# Altium PCB MainBoardPCB_4.PcbDoc (part 4 of 32)
Units mm, origin at the board's own origin, x right, y up, seen from the top; angles counter-clockwise.
Board outline 333.63 x 349.38 mm, 16 copper layers (L1, L2 (GND), L3 (Sign), L4 (GND), L5 (Sign), L6 (PWR/GND), L7(PWR/GND), L8 (Plane_GND), L9 (PWR/GND), L10 (PWR/GND), L11 (PWR/GND), L12 (Sign), L13 (GND), L14 (Sign), L15 (GND), L16), stack 2.502 mm thick; 2205 components, 1648 nets, 8314 pads, 3172 vias.
Unrouted connection lines stored in the file: 5141.
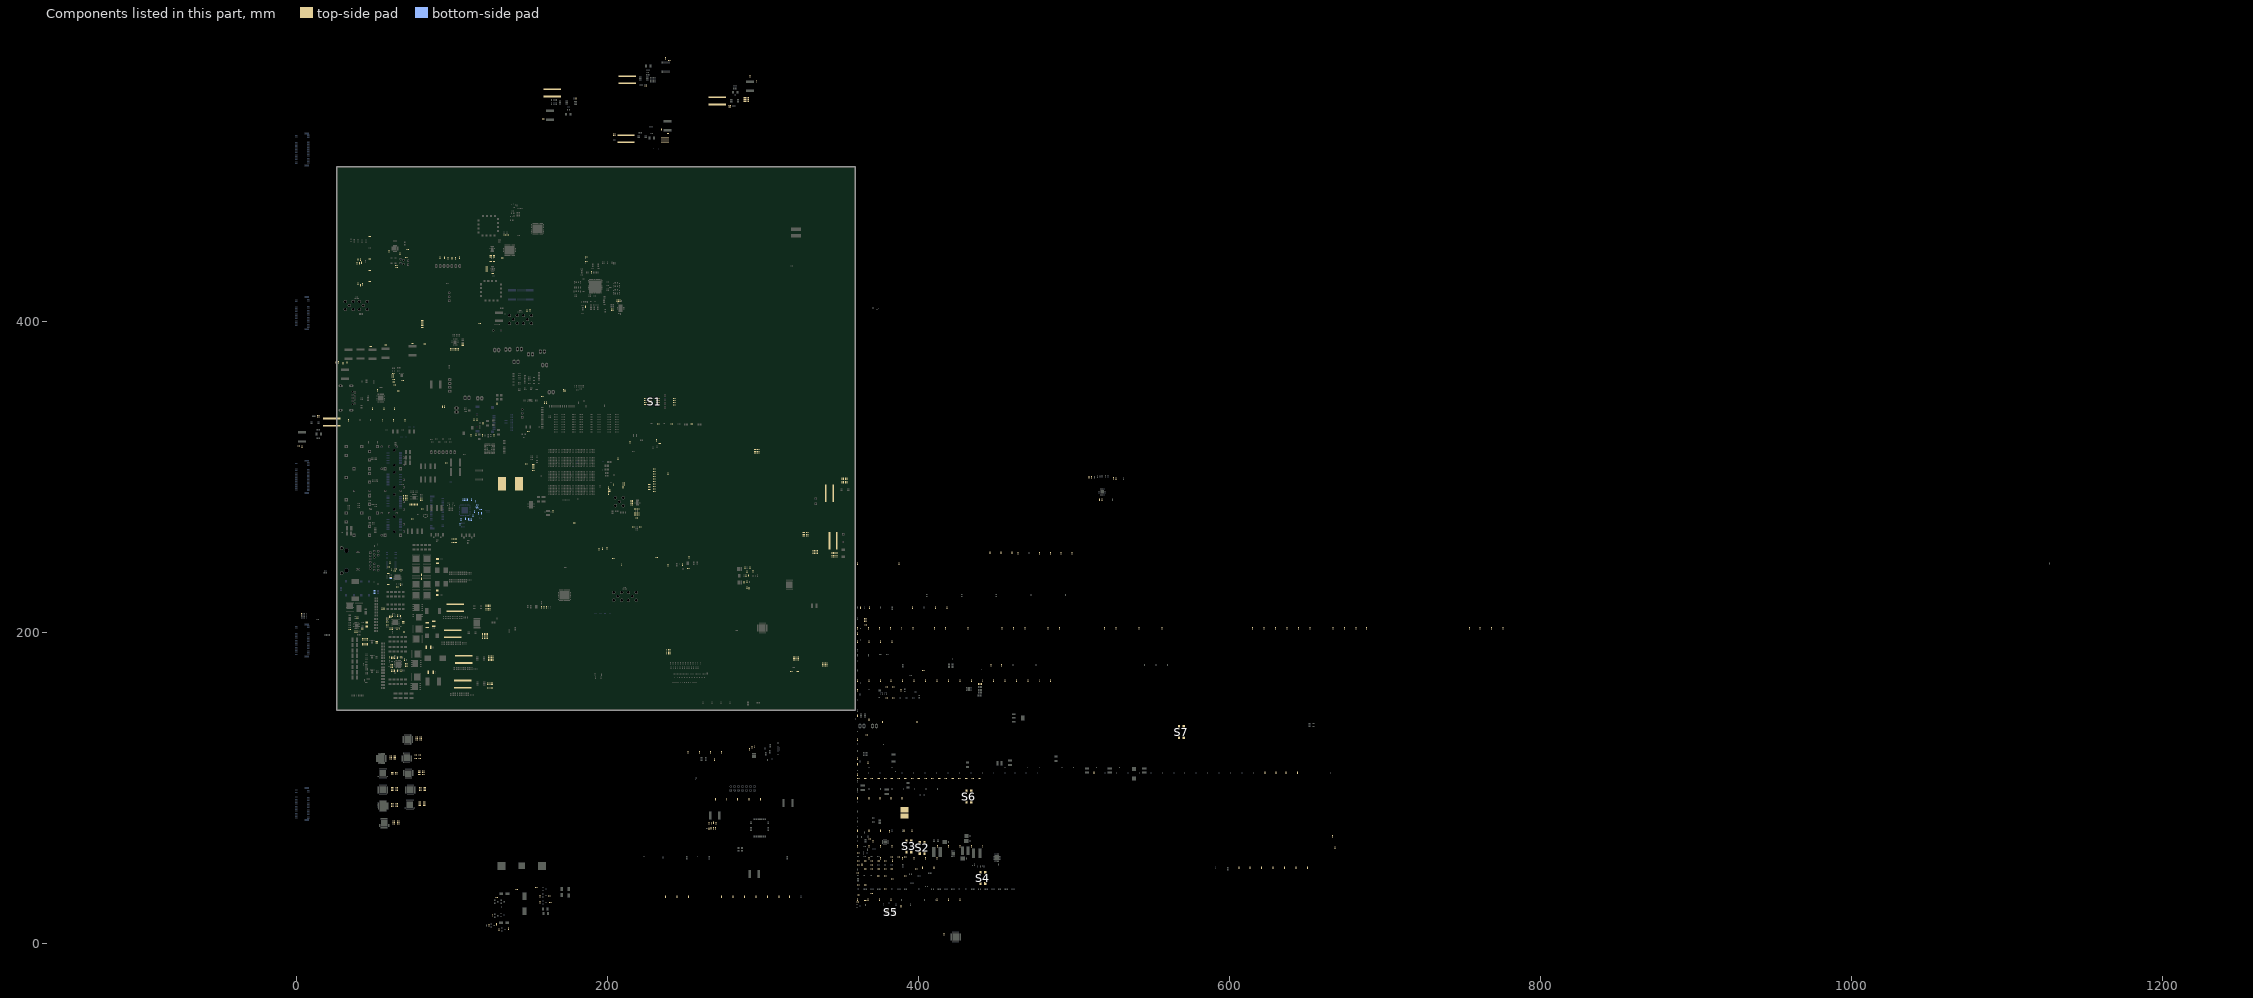
[diagram p16: the components of this part, seen from the top]

## Components (designator, comment, footprint, x,y, rotation, side; value= is the part's Value field where it differs from the comment) (continued)
R199 "0mR" "RES 0402/1005 RF" 3.202,211.734 r90 top
R200 "1.02kR" "RES 0402/1005 RF" 14.092,339.522 r0 top
R201 "0mR" "RES 0402/1005 RF" 288.214,541.35 r180 top
R202 "0mR" "RES 0402/1005 RF" 288.214,542.239 r180 top
R203 "0mR" "RES 0402/1005 RF" 288.214,543.128 r180 top
R204 "0mR" "RES 0402/1005 RF" 288.214,544.017 r180 top
R205 "0mR" "RES 0402/1005 RF" 290.373,541.35 r0 top
R206 "0mR" "RES 0402/1005 RF" 290.373,542.239 r0 top
R207 "0mR" "RES 0402/1005 RF" 290.373,543.128 r0 top
R208 "0mR" "RES 0402/1005 RF" 290.373,544.017 r0 top
R209 "1.02kR" "RES 0402/1005 RF" 278.586,537.724 r180 top
R210 "0mR" "RES 0402/1005 RF" 235.255,515.493 r270 top
R211 "0mR" "RES 0402/1005 RF" 236.525,515.493 r270 top
R212 "12.5k" "RES 0402/1005 RF" 179.728,543.303 r90 top
R213 "0mR" "RES 0402/1005 RF" 237.795,515.493 r270 top
R214 "10kR" "RES 0402/1005 RF" 224.745,551.227 r0 top
R215 "0mR" "RES 0402/1005 RF" 239.065,515.493 r270 top
R216 "31.2kR" "RES 0402/1005 RF" 14.092,338.379 r0 top
R217 "0mR" "RES 0402/1005 RF" 235.255,517.71 r90 top
R218 "10kR" "RES 0402/1005 RF" 278.793,538.867 r180 top
R219 "0mR" "RES 0402/1005 RF" 236.525,517.71 r90 top
R220 "4.99kR" "RES 0402/1005 RF" 205.029,520.065 r90 top
R221 "0mR" "RES 0402/1005 RF" 237.795,517.71 r90 top
R222 "0mR" "RES 0402/1005 RF" 239.065,517.71 r90 top
R223_I2C_Bridge "1kR" "RES 0402/1005 RF" 106.896,385.48 r0 top (schematic designator R223)
R223_I2C_Bridge_2 "1kR" "RES 0402/1005 RF" 509.782,299.86 r90 top (schematic designator R223)
R223_I2C_Bridge_3 "1kR" "RES 0402/1005 RF" 80.422,285.86 r0 top (schematic designator R223)
R224_I2C_Bridge "1kR" "RES 0402/1005 RF" 106.896,384.424 r0 top (schematic designator R224)
R224_I2C_Bridge_2 "1kR" "RES 0402/1005 RF" 525.403,299.047 r90 top (schematic designator R224)
R224_I2C_Bridge_3 "1kR" "RES 0402/1005 RF" 80.422,284.886 r0 top (schematic designator R224)
R225_I2C_Bridge "1kR" "RES 0402/1005 RF" 104.356,382.099 r270 top (schematic designator R225)
R225_I2C_Bridge_2 "1kR" "RES 0402/1005 RF" 516.572,285.382 r90 top (schematic designator R225)
R225_I2C_Bridge_3 "1kR" "RES 0402/1005 RF" 77.941,282.219 r270 top (schematic designator R225)
R226_I2C_Bridge "1kR" "RES 0402/1005 RF" 103.32,382.099 r270 top (schematic designator R226)
R226_I2C_Bridge_2 "1kR" "RES 0402/1005 RF" 511.382,299.682 r90 top (schematic designator R226)
R226_I2C_Bridge_3 "1kR" "RES 0402/1005 RF" 76.975,282.219 r270 top (schematic designator R226)
R227_I2C_Bridge "1kR" "RES 0402/1005 RF" 102.32,382.099 r270 top (schematic designator R227)
R227_I2C_Bridge_2 "1kR" "RES 0402/1005 RF" 527.003,298.869 r90 top (schematic designator R227)
R227_I2C_Bridge_3 "1kR" "RES 0402/1005 RF" 76.01,282.219 r270 top (schematic designator R227)
R228 "1.02kR" "RES 0402/1005 RF" 204.013,520.007 r90 top
R229 "0mR" "RES 0402/1005 RF" 352.006,296.639 r270 top
R230 "0mR" "RES 0402/1005 RF" 350.99,296.639 r270 top
R231_SPI_bridge1 "1kR" "RES 0402/1005 RF" 239.088,301.999 r90 top (schematic designator R231)
R231_SPI_bridge2 "1kR" "RES 0402/1005 RF" 150.127,407.23 r90 top (schematic designator R231)
R231_SPI_bridge3 "1kR" "RES 0402/1005 RF" 74.707,385.724 r180 top (schematic designator R231)
R232_SPI_bridge1 "1kR" "RES 0402/1005 RF" 158.92,530.015 r0 top (schematic designator R232)
R232_SPI_bridge2 "1kR" "RES 0402/1005 RF" 148.476,406.907 r90 top (schematic designator R232)
R232_SPI_bridge3 "1kR" "RES 0402/1005 RF" 62.573,362.737 r0 top (schematic designator R232)
R233_SPI_bridge1 "1kR" "RES 0402/1005 RF" 237.287,569.096 r270 top (schematic designator R233)
R233_SPI_bridge2 "1kR" "RES 0402/1005 RF" 199.632,254.055 r90 top (schematic designator R233)
R233_SPI_bridge3 "1kR" "RES 0402/1005 RF" 96.482,308.945 r180 top (schematic designator R233)
R234_SPI_bridge1 "1kR" "RES 0402/1005 RF" 239.896,567.699 r180 top (schematic designator R234)
R234_SPI_bridge2 "1kR" "RES 0402/1005 RF" 194.75,253.478 r90 top (schematic designator R234)
R234_SPI_bridge3 "1kR" "RES 0402/1005 RF" 62.308,366.547 r0 top (schematic designator R234)
R235_SPI_bridge1 "1kR" "RES 0402/1005 RF" 1.566,319.831 r0 top (schematic designator R235)
R235_SPI_bridge2 "1kR" "RES 0402/1005 RF" 197.036,253.801 r90 top (schematic designator R235)
R235_SPI_bridge3 "1kR" "RES 0402/1005 RF" 62.758,361.066 r0 top (schematic designator R235)
R236_SPI_bridge1 "1kR" "RES 0402/1005 RF" 3.746,319.329 r90 top (schematic designator R236)
R236_SPI_bridge2 "1kR" "RES 0402/1005 RF" 132.575,440.746 r180 top (schematic designator R236)
R236_SPI_bridge3 "1kR" "RES 0402/1005 RF" 47.968,383.819 r180 top (schematic designator R236)
R237_SPI_bridge1 "1kR" "RES 0402/1005 RF" 296.088,554.431 r90 top (schematic designator R237)
R237_SPI_bridge2 "1kR" "RES 0402/1005 RF" 32.474,373.532 r90 top (schematic designator R237)
R237_SPI_bridge3 "1kR" "RES 0402/1005 RF" 61.973,365.404 r0 top (schematic designator R237)
R238_SPI_bridge1 "1kR" "RES 0402/1005 RF" 291.77,557.606 r270 top (schematic designator R238)
R238_SPI_bridge2 "1kR" "RES 0402/1005 RF" 29.934,372.897 r90 top (schematic designator R238)
R238_SPI_bridge3 "1kR" "RES 0402/1005 RF" 57.366,384.708 r180 top (schematic designator R238)
R239_SPI_bridge1 "1kR" "RES 0402/1005 RF" 234.874,523.367 r270 top (schematic designator R239)
R239_SPI_bridge2 "1kR" "RES 0402/1005 RF" 27.013,373.659 r90 top (schematic designator R239)
R239_SPI_bridge3 "1kR" "RES 0402/1005 RF" 61.973,364.261 r0 top (schematic designator R239)
R240_SPI_bridge1 "1kR" "RES 0402/1005 RF" 239.009,520.7 r0 top (schematic designator R240)
R240_SPI_bridge2 "1kR" "RES 0402/1005 RF" 25.489,373.532 r90 top (schematic designator R240)
R240_SPI_bridge3 "1kR" "RES 0402/1005 RF" 82.443,385.47 r180 top (schematic designator R240)
R241 "0mR" "RES 0402/1005 RF" 411.95,54.712 r90 top
R242 "0mR" "RES 0402/1005 RF" 404.584,54.712 r90 top
R243 "0mR" "RES 0402/1005 RF" 397.205,54.712 r90 top
R244 "0mR" "RES 0402/1005 RF" 389.839,54.712 r90 top
R245 "100R" "RES 0402/1005 RF" 218.91,273.456 r180 top
R246 "120R" "RES 0402/1005 RF" 219.895,279.425 r180 top
R247 "127R" "RES 0402/1005 RF" 219.895,275.615 r180 top
R248 "127R" "RES 0402/1005 RF" 217.794,275.615 r0 top
R249 "120R" "RES 0402/1005 RF" 217.794,279.425 r180 top
R250 "82.5R" "RES 0402/1005 RF" 219.895,276.631 r180 top
R251 "82.5R" "RES 0402/1005 RF" 217.794,276.631 r0 top
R252 "1kR" "RES 0402/1005 RF" 215.227,284.447 r90 top
R253 "1kR" "RES 0402/1005 RF" 215.227,282.443 r270 top
R254 "1kR" "RES 0402/1005 RF" 216.243,284.447 r270 top
R255 "1kR" "RES 0402/1005 RF" 216.243,282.443 r90 top
R256 "120R" "RES 0402/1005 RF" 127.114,438.587 r180 top
R257 "49.9R" "RES 0402/1005 RF" 126.421,430.713 r180 top
R258 "120R" "RES 0402/1005 RF" 125.177,438.587 r180 top
R259 "82.5R" "RES 0402/1005 RF" 125.177,442.397 r0 top
R260 "82.5R" "RES 0402/1005 RF" 127.114,442.397 r180 top
R261 "127R" "RES 0402/1005 RF" 125.177,441.381 r0 top
R262 "127R" "RES 0402/1005 RF" 127.114,441.381 r180 top
R263 "60.4kR" "RES 0402/1005 RF" 122.6,432.364 r0 top
R264 "0mR" "RES 0402/1005 RF" 122.6,434.874 r0 top
R265 "0mR" "RES 0402/1005 RF" 122.6,433.649 r0 top
R266 "84.5kR" "RES 0402/1005 RF" 60.181,244.78 r90 top
R267 "4.7kR" "RES 0402/1005 RF" 370.04,32.182 r0 top
R268 "2R" "RES 0402/1005 RF" 59.242,237.714 r0 top
R269 "1.02kR" "RES 0402/1005 RF" 361.511,31.064 r0 top
R270 "160R" "RES 0402/1005 RF" 238.976,243.23 r270 top
R271 "5kR" "RES 0402/1005 RF" 61.041,240.32 r90 top
R272 "2R" "RES 0402/1005 RF" 60.606,235.139 r180 top
R273 "12kR" "RES 0402/1005 RF" 63.389,239.52 r180 top
R274 "10kR" "RES 0402/1005 RF" 398.704,47.739 r0 top
R275 "47kR" "RES 0402/1005 RF" 80.488,236.914 r90 top
R276 "4.7kR" "RES 0402/1005 RF" 214.452,322.344 r270 top
R277 "12kR" "RES 0402/1005 RF" 64.94,229.317 r0 top
R278 "12kR" "RES 0402/1005 RF" 63.889,240.855 r0 top
R279 "0mR" "RES 0402/1005 RF" 383.045,47.739 r0 top
R280 "47kR" "RES 0402/1005 RF" 80.488,234.339 r270 top
R281 "0mR" "RES 0402/1005 RF" 383.481,53.104 r90 top
R282 "0mR" "RES 0402/1005 RF" 378.714,47.739 r0 top
R283 "0mR" "RES 0402/1005 RF" 374.383,47.739 r0 top
R284 "18.2k (1MHz)" "RES 0402/1005 RF" 378.663,34.963 r0 top
R285 "2R" "RES 0402/1005 RF" 59.753,184.12 r270 top
R286 "0mR" "RES 0402/1005 RF" 370.053,47.739 r0 top
R287 "49.9kR" "RES 0402/1005 RF" 61.241,183.809 r90 top
R288 "Resistor_1210" RES_1210 85.014,190.309 r180 top value=3.6R
R289 "2R" "RES 0402/1005 RF" 61.331,179.317 r180 top
R290 "10kR" "RES 0402/1005 RF" 62.191,183.809 r270 top
R291 "150R" "RES 0402/1005 RF" 365.722,47.739 r0 top
R292 "Resistance" "RES 0402/1005 RF" 70.661,179.917 r180 top
R293 "0mR" "RES 0402/1005 RF" 61.331,178.317 r0 top
R294 "0mR" "RES 0402/1005 RF" 61.331,177.317 r0 top
R295 "12kR" "RES 0402/1005 RF" 67.169,183.85 r270 top
R296 "12kR" "RES 0402/1005 RF" 67.204,175.367 r90 top
R297 "10kR" "RES 0402/1005 RF" 62.14,175.401 r270 top
R298 "Resistor_1210" RES_1210 86.39,174.414 r180 top value=3.6R
R299 "47kR" "RES 0402/1005 RF" 70.661,179.067 r180 top
R300 "10kR" "RES 0402/1005 RF" 61.068,175.401 r90 top
R301 "150R" "RES 0402/1005 RF" 391.655,43.434 r0 top
R302 "1.4kR" "RES 0201/0603" 66.453,202.488 r90 top
R303 "2R" "RES 0402/1005 RF" 55.203,215.087 r270 top
R304 "0mR" "RES 0402/1005 RF" 117.92,398.695 r0 top
R305 "100R" "RES 0402/1005 RF" 383.154,41.402 r0 top
R306 "Resistor_1210" RES_1210 88.316,205.562 r90 top value=3.6R
R307 "2R" "RES 0402/1005 RF" 58.395,206.596 r0 top
R308 "100R" "RES 0402/1005 RF" 378.689,43.434 r0 top
R309 "100R" "RES 0402/1005 RF" 374.358,43.434 r0 top
R310 "0mR" "RES 0402/1005 RF" 58.395,208.526 r180 top
R311 "100R" "RES 0402/1005 RF" 368.676,67.005 r0 top
R312 "0mR" "RES 0402/1005 RF" 58.376,204.716 r0 top
R313 "12kR" "RES 0402/1005 RF" 64.953,210.754 r270 top
R314 "12kR" "RES 0402/1005 RF" 64.623,202.273 r90 top
R315 "196kR" "RES 0402/1005 RF" 61.041,202.273 r270 top
R316 "Resistor_1210" RES_1210 84.163,204.643 r270 top value=3.6R
R317 "47kR" "RES 0402/1005 RF" 68.656,206.039 r180 top
R318 "27kR" "RES 0402/1005 RF" 60.114,202.273 r90 top
R319 "10kR" "RES 0402/1005 RF" 117.299,276.692 r90 bottom
R320 "10kR" "RES 0402/1005 RF" 115.069,284.177 r90 bottom
R321 "100R" "RES 0402/1005 RF" 119.191,276.704 r90 bottom
R322 "5.76kR" "RES 0402/1005 RF" 113.468,274.906 r90 bottom
R323 "5.76kR" "RES 0402/1005 RF" 114.688,277.499 r90 bottom
R324 "100kR" "RES 0805/2012 RF" 50.292,225.882 r90 bottom
R325 "2.49kR" "RES 0402/1005 RF" 118.694,279.122 r0 bottom
R326 "2.49kR" "RES 0402/1005 RF" 116.313,279.884 r0 bottom
R327 "2.49kR" "RES 0402/1005 RF" 116.072,280.722 r0 bottom
R328 "2.49kR" "RES 0402/1005 RF" 116.402,281.809 r0 bottom
R329 "100R" "RES 0402/1005 RF" 107.08,285.243 r90 bottom
R330 "100R" "RES 0402/1005 RF" 108.16,285.205 r90 bottom
R331 "100R" "RES 0402/1005 RF" 109.176,285.251 r90 bottom
R332 "100R" "RES 0402/1005 RF" 112.694,285.243 r270 bottom
R333 "2.2kR" "RES 0402/1005 RF" 108.79,272.944 r90 bottom
R334 "11kR" "RES 0402/1005" 105.81,272.708 r270 bottom
R335 "1MR" "RES 0402/1005 RF" 105.112,269.597 r90 bottom
R336 "2.2kR" "RES 0402/1005 RF" 112.702,272.331 r90 bottom
R337 "2.2kR" "RES 0402/1005 RF" 110.649,272.581 r90 bottom
R338 "2.2kR" "RES 0402/1005 RF" 111.614,272.449 r90 bottom
R339 "105kR" "RES 0402/1005 RF" 120.155,334.607 r90 top
R340 "10kR" "RES 0402/1005 RF" 116.087,336.73 r90 top
R341 "15kR" "RES 0402/1005 RF" 114.38,336.692 r90 top
R342 "105kR" "RES 0402/1005 RF" 115.595,327.144 r90 top
R343 "10kR" "RES 0402/1005 RF" 127.203,326.801 r90 top
R344 "15kR" "RES 0402/1005 RF" 119.837,326.801 r90 top
R345 "0R" "RES 0402/1005 RF" 112.471,326.801 r90 top
R346 "4.7kR" "RES 0402/1005 RF" 70.724,441.147 r0 top
R347 "4.7kR" "RES 0402/1005 RF" 147.859,307.142 r0 top
R348 "4.7kR" "RES 0402/1005 RF" 147.917,308.254 r0 top
R349 "4.7kR" "RES 0402/1005 RF" 243.109,346.354 r0 top
R350 "4.7kR" "RES 0402/1005 RF" 243.109,347.667 r0 top
R351 "4.7kR" "RES 0402/1005 RF" 243.109,348.979 r0 top
R352 "4.7kR" "RES 0402/1005 RF" 243.109,350.291 r0 top
R353 "4.7kR" "RES 0402/1005 RF" 39.771,424.265 r90 top
R354 "4.7kR" "RES 0402/1005 RF" 64.224,435.813 r0 top
R355 "4.7kR" "RES 0402/1005 RF" 64.605,434.543 r0 top
R356 "4.7kR" "RES 0402/1005 RF" 42.498,423.815 r270 top
R357 "4.7kR" "RES 0402/1005 RF" 41.198,423.365 r90 top
R358 "499R" "RES 0402/1005 RF" 224.515,346.472 r180 top
R359 "499R" "RES 0402/1005 RF" 224.315,347.751 r180 top
R360 "499R" "RES 0402/1005 RF" 224.315,349.021 r180 top
R361 "499R" "RES 0402/1005 RF" 224.315,350.291 r180 top
R362 "30R" "RES 0402/1005 RF" 39.009,437.413 r90 top
R363 "4.7kR" "RES 0402/1005 RF" 39.771,439.768 r90 top
R364 "4.7kR" "RES 0402/1005 RF" 40.548,437.482 r90 top
R365 "4.7kR" "RES 0402/1005 RF" 41.93,437.54 r90 top
R366 "10kR" "RES 0402/1005 RF" 41.295,439.699 r90 top
R367 "4.7kR" "RES 0402/1005 RF" 71.74,446.303 r0 top
R368 "261R" "RES 0402/1005 RF" 47.333,454.431 r180 top
R369 "10kR" "RES 0402/1005 RF" 66.787,443.56 r90 top
R370 "10kR" "RES 0402/1005 RF" 47.333,425.475 r180 top
R371 "10kR" "RES 0402/1005 RF" 47.333,432.841 r180 top
R372 "8.06kR" "RES 0402/1005 RF" 47.333,440.207 r180 top
R373 "10kR" "RES 0402/1005 RF" 59.548,445.084 r90 top
R374 "4.7MR" "RES 0402/1005 RF" 149.073,329.222 r0 top
R375 "40.2R" "RES 0402/1005 RF" 129.107,347.154 r270 top
R376 "0R" "RES 0402/1005 RF" 69.977,336.448 r90 top
R377 "0R" "RES 0402/1005 RF" 62.611,336.448 r90 top
R378 "0R" "RES 0402/1005 RF" 55.245,336.448 r90 top
R379 "8.06kR" "RES 0402/1005 RF" 33.655,336.448 r90 top
R380 "4.22kR" "RES 0402/1005 RF" 453.555,178.905 r90 top
R381 "4.7kR" "RES 0402/1005 RF" 418.3,215.862 r90 top
R382 "4.7kR" "RES 0402/1005 RF" 410.921,215.862 r90 top
R383 "10kR" "RES 0402/1005 RF" 396.189,215.862 r90 top
R384 "71.5R" "RES 0402/1005 RF" 365.76,208.915 r0 top
R385 "71.5R" "RES 0402/1005 RF" 365.76,207.899 r0 top
R386 "8.87kR" "RES 0402/1005 RF" 365.76,206.883 r0 top
R387 "5.1kR" "RES 0402/1005 RF" 366.23,204.826 r0 top
R388 "0mR" "RES 0402/1005 RF" 289.784,228.694 r90 top
R389 "0mR" "RES 0402/1005 RF" 291.054,228.509 r90 top
R390 "0mR" "RES 0402/1005 RF" 289.911,238.904 r90 top
R391 "75kR" "RES 0402/1005 RF" 291.689,241.571 r90 top
R392 "100kR" "RES 0402/1005 RF" 288.514,241.571 r90 top
R393 "15kR" "RES 0402/1005 RF" 293.721,239.354 r90 top
R394 "51.1kR" "RES 0402/1005 RF" 289.911,232.604 r90 top
R395 "10kR" "RES 0402/1005 RF" 439.318,105.893 r0 top
R396 "15kR" "RES 0402/1005 RF" 287.879,232.104 r90 top
R397 "21.5kR" "RES 0402/1005 RF" 290.673,236.562 r90 top
R398 "10kR" "RES 0402/1005 RF" 434.988,105.893 r0 top
R399 "15kR" "RES 0402/1005 RF" 289.276,236.435 r90 top
R400 "0mR" "RES 0402/1005 RF" 375.615,54.712 r90 top
R401 "10k" "RES 0402/1005 RF" 265.244,73.834 r90 top
R402 "0R" "RES 0402/1005 RF" 266.818,77.114 r90 top
R403 "0R" "RES 0402/1005 RF" 268.292,74.038 r90 top
R404 "0R" "RES 0402/1005 RF" 269.866,77.318 r90 top
R405 "0R" "RES 0402/1005 RF" 269.588,73.961 r90 top
R406 "0R" "RES 0402/1005 RF" 265.32,77.241 r90 top
R407 "0R" "RES 0402/1005 RF" 266.794,74.165 r90 top
R408 "0R" "RES 0402/1005 RF" 268.368,77.445 r90 top
R409 "0R" "RES 0402/1005 RF" 498.805,250.965 r90 top
R410 "10k" "RES 0402/1005 RF" 491.693,250.965 r90 top
R411 "0R" "RES 0402/1005 RF" 485.089,250.965 r90 top
R412 "0R" "RES 0402/1005 RF" 477.977,250.965 r90 top
R413 "0R" "RES 0402/1005 RF" 464.007,250.965 r90 top
R414 "0R" "RES 0402/1005 RF" 460.273,251.338 r90 top
R415 "0R" "RES 0402/1005 RF" 453.161,251.338 r90 top
R416 "0R" "RES 0402/1005 RF" 446.037,251.338 r90 top
R417 "10k" "RES 0402/1005 RF" 273.337,122.949 r90 top
R418 "0R" "RES 0402/1005 RF" 268.808,118.161 r90 top
R419 "2kR" "RES 0402/1005 RF" 266.225,122.949 r90 top
R420 "10k" "RES 0402/1005 RF" 251.989,122.949 r90 top
R421 "0R" "RES 0402/1005 RF" 259.355,122.949 r90 top
R422 "10k" "RES 0402/1005 RF" 303.035,29.858 r90 top
R423 "12kR" "RES 0402/1005 RF" 410.159,48.476 r90 top
R424 "1kR" "RES 0402/1005 RF" 402.793,48.476 r90 top
R425 "4.7kR" "RES 0402/1005 RF" 74.647,272.784 r0 top
R426 "4.7kR" "RES 0402/1005 RF" 74.765,271.767 r0 top
R427 "1kR" "RES 0402/1005 RF" 365.722,37.401 r0 top
R428 "1kR" "RES 0402/1005 RF" 368.249,54.712 r90 top
R429 "0mR" "RES 0402/1005 RF" 80.988,279.244 r0 top
R430_5V_to_3V3_for_FTDI "105kR" "RES 0402/1005 RF" 291.541,124.892 r90 top (schematic designator R430)
R430_U_5V_to_3V31 "105kR" "RES 0402/1005 RF" 160.801,216.124 r270 top (schematic designator R430)
R430_U_5V_to_3V32 "105kR" "RES 0402/1005 RF" 248.361,243.489 r270 top (schematic designator R430)
R430_U_5V_to_3V33 "105kR" "RES 0402/1005 RF" 65.425,355.117 r0 top (schematic designator R430)
R431_5V_to_3V3_for_FTDI "100kR" "RES 0402/1005 RF" 294.792,126.363 r90 top (schematic designator R431)
R431_U_5V_to_3V31 "100kR" "RES 0402/1005 RF" 157.728,216.123 r90 top (schematic designator R431)
R431_U_5V_to_3V32 "100kR" "RES 0402/1005 RF" 252.578,248.374 r90 top (schematic designator R431)
R431_U_5V_to_3V33 "100kR" "RES 0402/1005 RF" 68.468,361.848 r0 top (schematic designator R431)
R432_5V_to_3V3_for_FTDI "15kR" "RES 0402/1005 RF" 293.027,126.211 r90 top (schematic designator R432)
R432_U_5V_to_3V31 "15kR" "RES 0402/1005 RF" 159.201,216.148 r90 top (schematic designator R432)
R432_U_5V_to_3V32 "15kR" "RES 0402/1005 RF" 252.019,241.198 r180 top (schematic designator R432)
R432_U_5V_to_3V33 "15kR" "RES 0402/1005 RF" 63.208,358.927 r0 top (schematic designator R432)
R433 "56kR" "RES 0402/1005 RF" 383.921,157.861 r0 top
R434 "10kR" "RES 0402/1005 RF" 379.603,157.861 r0 top
R435 "10kR" "RES 0402/1005 RF" 368.719,215.913 r90 top
R436 "3.57kR" "RES 0402/1005 RF" 202.527,407.496 r90 top
R437 "1.15kR" "RES 0402/1005 RF" 403.213,175.514 r0 top
R438 "3.57kR" "RES 0402/1005 RF" 207.049,413.148 r90 top
R439 "1.15kR" "RES 0402/1005 RF" 206.083,413.148 r270 top
R440 "20kR" "RES 0402/1005 RF" 203.604,407.496 r90 top
R441 "20kR" "RES 0402/1005 RF" 207.996,413.148 r90 top
R442 "100kR" "RES 0402/1005 RF" 360.934,199.009 r90 top
R443 "698kR" "RES 0805/2012 RF" 439.547,166.751 r0 top
R444 "49.9kR" "RES 0402/1005 RF" 383.921,164.973 r0 top
R445 "49.9kR" "RES 0402/1005 RF" 379.603,164.973 r0 top
R446 "120R" "RES 0402/1005 RF" 388.785,162.738 r90 top
R447 "120R" "RES 0402/1005 RF" 360.883,162.738 r90 top
R448_U_Pomiar_pradu_napiecia_1 "FCSL110R005FER" FCSL110R005FERCT-ND 342.862,289.458 r0 top (schematic designator R448)
R448_U_Pomiar_pradu_napiecia_2 "FCSL110R005FER" FCSL110R005FERCT-ND 345.148,258.851 r180 top (schematic designator R448)
R448_U_Pomiar_pradu_napiecia_3 "FCSL110R005FER" FCSL110R005FERCT-ND 107.759,182.601 r90 top (schematic designator R448)
R448_U_Pomiar_pradu_napiecia_4 "FCSL110R005FER" FCSL110R005FERCT-ND 106.904,166.738 r90 top (schematic designator R448)
R448_U_Pomiar_pradu_napiecia_5 "FCSL110R005FER" FCSL110R005FERCT-ND 102.092,215.887 r90 top (schematic designator R448)
R448_U_Pomiar_pradu_napiecia_6 "FCSL110R005FER" FCSL110R005FERCT-ND 100.635,199.06 r90 top (schematic designator R448)
R448_U_Pomiar_pradu_napiecia_7 "FCSL110R005FER" FCSL110R005FERCT-ND 164.668,546.875 r90 top (schematic designator R448)
R448_U_Pomiar_pradu_napiecia_8 "FCSL110R005FER" FCSL110R005FERCT-ND 212.776,555.38 r90 top (schematic designator R448)
R448_U_Pomiar_pradu_napiecia_9 "FCSL110R005FER" FCSL110R005FERCT-ND 22.669,335.204 r270 top (schematic designator R448)
R448_U_Pomiar_pradu_napiecia_10 "FCSL110R005FER" FCSL110R005FERCT-ND 270.688,541.731 r270 top (schematic designator R448)
R448_U_Pomiar_pradu_napiecia_11 "FCSL110R005FER" FCSL110R005FERCT-ND 212.014,517.398 r90 top (schematic designator R448)
R449 "0mR" "RES 0402/1005 RF" 81.09,400.473 r0 top
R450 "0mR" "RES 0402/1005 RF" 81.09,399.457 r0 top
R451 "0mR" "RES 0402/1005 RF" 81.09,395.901 r0 top
R452 "0mR" "RES 0402/1005 RF" 80.963,401.997 r0 top
R453 "0mR" "RES 0402/1005 RF" 81.09,397.229 r0 top
R454 "0mR" "RES 0402/1005 RF" 81.09,398.314 r0 top
R455 "0mR" "RES 0402/1005 RF" 240.373,186.426 r270 top
R455_1 "0mR" "RES 0402/1005 RF" 61.698,90.027 r180 top (schematic designator R455)
R456 "0mR" "RES 0402/1005 RF" 240.373,188.458 r90 top
R456_1 "0mR" "RES 0402/1005 RF" 64.629,90.027 r0 top (schematic designator R456)
R457 "0mR" "RES 0402/1005 RF" 353.022,296.639 r270 top
R458 "0mR" "RES 0402/1005 RF" 239.357,186.426 r270 top
R458_1 "0mR" "RES 0402/1005 RF" 61.697,88.983 r180 top (schematic designator R458)
R459 "0mR" "RES 0402/1005 RF" 354.038,296.639 r270 top
R460 "0mR" "RES 0402/1005 RF" 239.357,188.458 r90 top
R460_1 "0mR" "RES 0402/1005 RF" 64.629,88.983 r0 top (schematic designator R460)
R461 "0mR" "RES 0402/1005 RF" 352.006,298.671 r90 top
R462 "0mR" "RES 0402/1005 RF" 238.214,186.426 r270 top
R462_1 "0mR" "RES 0402/1005 RF" 61.698,87.962 r180 top (schematic designator R462)
R463 "0mR" "RES 0402/1005 RF" 350.99,298.671 r90 top
R464 "0mR" "RES 0402/1005 RF" 238.214,188.458 r90 top
R464_1 "0mR" "RES 0402/1005 RF" 64.629,87.962 r0 top (schematic designator R464)
R465 "0mR" "RES 0402/1005 RF" 353.022,298.671 r90 top
R466 "0mR" "RES 0402/1005 RF" 354.038,298.671 r90 top
R467 "0mR" "RES 0402/1005 RF" 345.529,249.003 r270 top
R468 "0mR" "RES 0402/1005 RF" 344.513,249.003 r270 top
R469 "0mR" "RES 0402/1005 RF" 69.041,287.622 r90 top
R470 "0mR" "RES 0402/1005 RF" 69.041,285.648 r270 top
R471 "0mR" "RES 0402/1005 RF" 70.057,287.622 r90 top
R472 "0mR" "RES 0402/1005 RF" 70.057,285.648 r270 top
R473 "0mR" "RES 0402/1005 RF" 71.073,287.622 r90 top
R474 "0mR" "RES 0402/1005 RF" 71.073,285.648 r270 top
R475 "0mR" "RES 0402/1005 RF" 102.629,259.923 r0 top
R475_1 "0mR" "RES 0402/1005 RF" 60.714,118.511 r180 top (schematic designator R475)
R476 "0mR" "RES 0402/1005 RF" 100.655,259.923 r180 top
R476_1 "0mR" "RES 0402/1005 RF" 63.426,118.519 r0 top (schematic designator R476)
R477 "0mR" "RES 0402/1005 RF" 102.629,258.907 r0 top
R477_1 "0mR" "RES 0402/1005 RF" 60.718,119.548 r180 top (schematic designator R477)
R478 "0mR" "RES 0402/1005 RF" 100.655,258.907 r180 top
R478_1 "0mR" "RES 0402/1005 RF" 63.43,119.556 r0 top (schematic designator R478)
R479 "0mR" "RES 0402/1005 RF" 102.629,257.845 r0 top
R479_1 "0mR" "RES 0402/1005 RF" 60.718,120.592 r180 top (schematic designator R479)
R480 "0mR" "RES 0402/1005 RF" 100.655,257.845 r180 top
R480_1 "0mR" "RES 0402/1005 RF" 63.43,120.6 r0 top (schematic designator R480)
R481 "0R" "RES 0402/1005 RF" 178.867,270.281 r0 top
R482 "150R" "RES 0402/1005 RF" 201.072,291.539 r180 top
R483 "150R" "RES 0402/1005 RF" 201.072,290.539 r180 top
R484 "71.5R" "RES 0402/1005 RF" 200.622,292.989 r270 top
R485 "71.5R" "RES 0402/1005 RF" 200.622,289.089 r90 top
R486 "8.87kR" "RES 0402/1005 RF" 203.797,294.82 r90 top
R487 "5.1kR" "RES 0402/1005 RF" 210.555,294.895 r180 top
R488 "1kR" "RES 0402/1005 RF" 210.555,295.911 r180 top
R489 "100R" "RES 0402/1005 RF" 210.105,293.423 r90 top
R490 "10kR" "RES 0402/1005 RF" 52.083,355.6 r90 top
R491 "1MR" "RES 0402/1005 RF" 446.697,178.905 r90 top
R492 "0mR" "RES 0402/1005 RF" 320.345,184.208 r180 top
R492_1 "0mR" "RES 0402/1005 RF" 79.263,88.634 r180 top (schematic designator R492)
R493 "0mR" "RES 0402/1005 RF" 322.377,184.208 r0 top
R493_1 "0mR" "RES 0402/1005 RF" 82.159,88.64 r0 top (schematic designator R493)
R494 "0mR" "RES 0402/1005 RF" 320.345,183.134 r180 top
R494_1 "0mR" "RES 0402/1005 RF" 79.263,89.74 r180 top (schematic designator R494)
R495 "0mR" "RES 0402/1005 RF" 322.377,183.134 r0 top
R495_1 "0mR" "RES 0402/1005 RF" 82.159,89.733 r0 top (schematic designator R495)
R496 "0mR" "RES 0402/1005 RF" 320.345,182.118 r180 top
R496_1 "0mR" "RES 0402/1005 RF" 79.263,90.833 r180 top (schematic designator R496)
R497 "0mR" "RES 0402/1005 RF" 322.377,182.118 r0 top
R497_1 "0mR" "RES 0402/1005 RF" 82.158,90.833 r0 top (schematic designator R497)
R498 "0R" "RES 0402/1005 RF" 322.589,174.921 r0 top
R499 "1kR" "RES 0402/1005 RF" 318.271,174.921 r0 top
R500 "0mR" "RES 0402/1005 RF" 338.829,180.398 r180 top
R500_1 "0mR" "RES 0402/1005 RF" 61.84,98.264 r180 top (schematic designator R500)
R501 "0mR" "RES 0402/1005 RF" 340.861,180.398 r0 top
R501_1 "0mR" "RES 0402/1005 RF" 64.629,98.266 r0 top (schematic designator R501)
R502 "0mR" "RES 0402/1005 RF" 338.829,178.308 r180 top
R502_1 "0mR" "RES 0402/1005 RF" 61.84,99.316 r180 top (schematic designator R502)
R503 "0mR" "RES 0402/1005 RF" 340.861,178.308 r0 top
R503_1 "0mR" "RES 0402/1005 RF" 64.629,99.319 r0 top (schematic designator R503)
R504 "0mR" "RES 0402/1005 RF" 338.829,179.324 r180 top
R504_1 "0mR" "RES 0402/1005 RF" 61.84,100.364 r180 top (schematic designator R504)
R505 "0mR" "RES 0402/1005 RF" 340.861,179.324 r0 top
R505_1 "0mR" "RES 0402/1005 RF" 64.629,100.366 r0 top (schematic designator R505)
R506 "10kR" "RES 0402/1005 RF" 226.795,306.502 r180 top
R507 "10kR" "RES 0402/1005 RF" 230.206,290.614 r180 top
R508 "0mR" "RES 0402/1005 RF" 295.013,317.456 r180 top
R508_1 "0mR" "RES 0402/1005 RF" 79.704,98.272 r180 top (schematic designator R508)
R509 "0mR" "RES 0402/1005 RF" 297.045,317.456 r0 top
R509_1 "0mR" "RES 0402/1005 RF" 82.697,98.272 r0 top (schematic designator R509)
R510 "0mR" "RES 0402/1005 RF" 295.013,316.382 r180 top
R510_1 "0mR" "RES 0402/1005 RF" 79.704,99.3 r180 top (schematic designator R510)
R511 "0mR" "RES 0402/1005 RF" 297.045,316.382 r0 top
R511_1 "0mR" "RES 0402/1005 RF" 82.697,99.316 r0 top (schematic designator R511)
R512 "0mR" "RES 0402/1005 RF" 295.013,315.366 r180 top
R512_1 "0mR" "RES 0402/1005 RF" 79.705,100.316 r180 top (schematic designator R512)
R513 "0mR" "RES 0402/1005 RF" 297.045,315.366 r0 top
R513_1 "0mR" "RES 0402/1005 RF" 82.697,100.316 r0 top (schematic designator R513)
R514 "10kR" "RES 0402/1005 RF" 226.795,303.282 r180 top
R515 "10kR" "RES 0402/1005 RF" 226.795,301.671 r180 top
R516 "0mR" "RES 0402/1005 RF" 332.633,252.686 r180 top
R516_1 "0mR" "RES 0402/1005 RF" 76.803,121.107 r180 top (schematic designator R516)
R517 "0mR" "RES 0402/1005 RF" 334.665,252.686 r0 top
R517_1 "0mR" "RES 0402/1005 RF" 79.421,121.107 r0 top (schematic designator R517)
R518 "0mR" "RES 0402/1005 RF" 332.633,251.612 r180 top
R518_1 "0mR" "RES 0402/1005 RF" 76.803,120.002 r180 top (schematic designator R518)
R519 "0mR" "RES 0402/1005 RF" 334.665,251.612 r0 top
R519_1 "0mR" "RES 0402/1005 RF" 79.421,120.002 r0 top (schematic designator R519)
R520 "0mR" "RES 0402/1005 RF" 332.633,250.596 r180 top
R520_1 "0mR" "RES 0402/1005 RF" 76.804,118.89 r180 top (schematic designator R520)
R521 "0mR" "RES 0402/1005 RF" 334.665,250.596 r0 top
R521_1 "0mR" "RES 0402/1005 RF" 79.423,118.89 r0 top (schematic designator R521)
R522 "10kR" "RES 0402/1005 RF" 226.795,292.009 r180 top
R523 "10kR" "RES 0402/1005 RF" 226.795,293.62 r180 top
R524 "0mR" "RES 0402/1005 RF" 326.436,264.116 r180 top
R525 "0mR" "RES 0402/1005 RF" 328.468,264.116 r0 top
R526 "0mR" "RES 0402/1005 RF" 326.436,263.042 r180 top
R527 "0mR" "RES 0402/1005 RF" 328.468,263.042 r0 top
R528 "0mR" "RES 0402/1005 RF" 326.436,262.026 r180 top
R529 "0mR" "RES 0402/1005 RF" 328.468,262.026 r0 top
R530 "10kR" "RES 0402/1005 RF" 226.795,296.84 r180 top
R531 "10kR" "RES 0402/1005 RF" 226.795,295.23 r180 top
R532 "75R" "RES 0402/1005 RF" 133.96,455.478 r180 top
R533 "30R" "RES 0402/1005 RF" 136.05,455.478 r180 top
R534 "100R" "RES 0402/1005 RF" 231.864,248.056 r0 top
R535 "100R" "RES 0402/1005 RF" 203.797,247.548 r0 top
R536 "150R" "RES 0402/1005 RF" 216.76,267.632 r180 top
R537 "150R" "RES 0402/1005 RF" 221.11,267.632 r180 top
R538 "1kR" "RES 0402/1005 RF" 361.391,37.401 r0 top
R539 "160R" "RES 0402/1005 RF" 209.258,243.484 r270 top
R540 "0R" "RES 0402/1005 RF" 189.88,431.485 r270 top
R541 "100R" "RES 0402/1005 RF" 368.249,143.916 r90 top
R542 "100R" "RES 0402/1005 RF" 360.807,146.26 r90 top
R543 "100R" "RES 0402/1005 RF" 186.34,441.365 r180 top
R544 "1kR" "RES 0402/1005 RF" 186.017,409.532 r90 top
R545 "49.9R" "RES 0402/1005 RF" 186.34,438.571 r180 top
R546 "10kR" "RES 0402/1005 RF" 230.206,301.886 r180 top
R547 "10kR" "RES 0402/1005 RF" 226.795,300.061 r180 top
R548 "10kR" "RES 0402/1005 RF" 230.206,300.276 r180 top
R549 "10kR" "RES 0402/1005 RF" 230.206,297.055 r180 top
R550 "10kR" "RES 0402/1005 RF" 230.206,303.497 r180 top
R551 "10kR" "RES 0402/1005 RF" 230.206,295.445 r180 top
R552 "10kR" "RES 0402/1005 RF" 230.206,292.224 r180 top
R553 "10kR" "RES 0402/1005 RF" 230.206,305.107 r180 top
R554 "10kR" "RES 0402/1005 RF" 230.206,298.666 r180 top
R555 "10kR" "RES 0402/1005 RF" 230.206,293.835 r180 top
R556 "10kR" "RES 0402/1005 RF" 226.795,304.892 r180 top
R557 "10kR" "RES 0402/1005 RF" 226.795,298.451 r180 top
R558_I2C_Bridge "1kR" "RES 0402/1005 RF" 101.32,382.099 r270 top (schematic designator R558)
R558_I2C_Bridge_2 "1kR" "RES 0402/1005 RF" 518.173,285.204 r90 top (schematic designator R558)
R558_I2C_Bridge_3 "1kR" "RES 0402/1005 RF" 75.045,282.219 r270 top (schematic designator R558)
R559_I2C_Bridge "1kR" "RES 0402/1005 RF" 100.135,382.099 r270 top (schematic designator R559)
R559_I2C_Bridge_2 "1kR" "RES 0402/1005 RF" 387.541,244.17 r90 top (schematic designator R559)
R559_I2C_Bridge_3 "1kR" "RES 0402/1005 RF" 74.079,282.219 r270 top (schematic designator R559)
R560_I2C_Bridge "1kR" "RES 0402/1005 RF" 99.022,382.099 r270 top (schematic designator R560)
R560_I2C_Bridge_2 "1kR" "RES 0402/1005 RF" 360.883,244.17 r90 top (schematic designator R560)
R560_I2C_Bridge_3 "1kR" "RES 0402/1005 RF" 73.114,282.219 r270 top (schematic designator R560)
R561 "0mR" "RES 0402/1005 RF" 124.498,184.31 r90 top
R562 "0mR" "RES 0402/1005 RF" 123.482,184.31 r90 top
R563 "0mR" "RES 0402/1005 RF" 125.514,184.31 r90 top
R564 "0mR" "RES 0402/1005 RF" 126.53,184.31 r90 top
R565 "0mR" "RES 0402/1005 RF" 124.498,182.278 r270 top
R566 "0mR" "RES 0402/1005 RF" 123.482,182.278 r270 top
R567 "0mR" "RES 0402/1005 RF" 125.514,182.278 r270 top
R568 "0mR" "RES 0402/1005 RF" 126.53,182.278 r270 top
R569 "0mR" "RES 0402/1005 RF" 125.539,165.349 r0 top
R570 "0mR" "RES 0402/1005 RF" 125.539,164.333 r0 top
R571 "0mR" "RES 0402/1005 RF" 125.539,166.365 r0 top
R572 "0mR" "RES 0402/1005 RF" 125.54,167.381 r0 top
R573 "0mR" "RES 0402/1005 RF" 123.507,165.349 r180 top
R574 "0mR" "RES 0402/1005 RF" 123.508,164.333 r180 top
R575 "0mR" "RES 0402/1005 RF" 123.508,166.365 r180 top
R576 "0mR" "RES 0402/1005 RF" 123.508,167.381 r180 top
R577 "0mR" "RES 0402/1005 RF" 122.504,216.987 r90 top
R578 "0mR" "RES 0402/1005 RF" 121.488,216.987 r90 top
R579 "0mR" "RES 0402/1005 RF" 123.52,216.987 r90 top
R580 "0mR" "RES 0402/1005 RF" 124.536,216.987 r90 top
R581 "0mR" "RES 0402/1005 RF" 122.504,214.955 r270 top
R582 "0mR" "RES 0402/1005 RF" 121.488,214.955 r270 top
R583 "0mR" "RES 0402/1005 RF" 123.52,214.955 r270 top
R584 "0mR" "RES 0402/1005 RF" 124.536,214.955 r270 top
R585 "0mR" "RES 0402/1005 RF" 120.872,196.601 r270 top
R586 "0mR" "RES 0402/1005 RF" 119.856,196.601 r270 top
R587 "0mR" "RES 0402/1005 RF" 121.888,196.601 r270 top
R588 "0mR" "RES 0402/1005 RF" 122.904,196.601 r270 top
R589 "0mR" "RES 0402/1005 RF" 120.872,198.633 r90 top
R590 "0mR" "RES 0402/1005 RF" 119.856,198.633 r90 top
R591 "0mR" "RES 0402/1005 RF" 121.888,198.633 r90 top
R592 "0mR" "RES 0402/1005 RF" 122.904,198.633 r90 top
R593 "0mR" "RES 0402/1005 RF" 346.545,249.003 r270 top
R594 "0mR" "RES 0402/1005 RF" 347.561,249.003 r270 top
R595 "0mR" "RES 0402/1005 RF" 345.529,251.035 r90 top
R596 "0mR" "RES 0402/1005 RF" 344.513,251.035 r90 top
R597 "0mR" "RES 0402/1005 RF" 346.545,251.035 r90 top
R598 "0mR" "RES 0402/1005 RF" 347.561,251.035 r90 top
R599 "1kR" "RES 0402/1005 RF" 363.753,50.691 r90 top
R600 "0mR" "RES 0402/1005 RF" 367.741,116.091 r90 top
R601 "0mR" "RES 0402/1005 RF" 360.87,115.067 r90 top
R602 "10kR" "RES 0402/1005 RF" 378.714,52.959 r0 top
R603 "10kR" "RES 0402/1005 RF" 374.383,52.959 r0 top
R604 "10kR" "RES 0402/1005 RF" 370.053,52.959 r0 top
R605 "10kR" "RES 0402/1005 RF" 365.722,52.959 r0 top
R606 "10kR" "RES 0402/1005 RF" 361.391,52.959 r0 top
R607 "0mR" "RES 0402/1005 RF" 361.391,58.179 r0 top
R608 "10kR" "RES 0402/1005 RF" 365.722,27.521 r0 top
R609 "10kR" "RES 0402/1005 RF" 361.074,26.67 r0 top
R610 "1.33kR" "RES 0402/1005 RF" 67.378,240.02 r90 top
R611 "1.33kR" "RES 0402/1005 RF" 67.113,230.597 r270 top
R612 "270R" "RES 0402/1005 RF" 59.342,241.891 r180 top
R613 "2.4R" "RES 1206/3216" 90.765,245.884 r270 top
R614 "270R" "RES 0402/1005 RF" 59.242,230.712 r180 top
R615 "10kR" "RES 0402/1005 RF" 60.606,234.739 r0 bottom
R616 "2.4R" "RES 1206/3216" 90.717,225.431 r90 top
R617 "PU5931FKMP70R004L" PU5931 137.735,295.465 r0 top
R618 "10kR" "RES 0402/1005 RF" 430.657,105.893 r0 top
R619 "1.91kR" "RES 0402/1005 RF" 69.532,182.474 r90 top
R620 "2kR" "RES 0402/1005 RF" 70.68,178.1 r180 top
R621 "147kR" "RES 0402/1005 RF" 65.137,183.819 r90 top
R622 "340kR" "RES 0402/1005 RF" 65.175,175.443 r270 top
R623 "1.43kR" "RES 0402/1005 RF" 63.12,175.457 r90 top
R624 "15kR" "RES 0402/1005 RF" 63.175,183.76 r270 top
R625 "1.4kR" "RES 0201/0603" 67.001,210.554 r270 top
R626 "200kR" "RES 0402/1005 RF" 59.997,210.161 r90 top
R627 "10.5kR" "RES 0402/1005 RF" 60.944,210.183 r270 top
R628 "750kR" "RES 0402/1005 RF" 69.132,200.233 r270 top
R629 "Resistance" "RES 0402/1005 RF" 68.656,206.964 r180 top
R630 "10kR" "RES 0402/1005 RF" 51.568,193.051 r180 top
R631 "5.9kR" "RES 0402/1005 RF" 61.938,202.273 r90 top
R632 "100kR" "RES 0402/1005 RF" 382.981,55.689 r0 top
R633 "100kR" "RES 0402/1005 RF" 387.312,55.689 r0 top
R634 "100kR" "RES 0402/1005 RF" 391.643,55.689 r0 top
R635 "10k" "RES 0402/1005 RF" 317.259,29.858 r90 top
R636 "0R" "RES 0402/1005 RF" 295.669,29.858 r90 top
R637 "0R" "RES 0402/1005 RF" 288.29,29.858 r90 top
R638 "0R" "RES 0402/1005 RF" 273.558,29.858 r90 top
R639 "0R" "RES 0402/1005 RF" 244.894,29.858 r90 top
R640 "0R" "RES 0402/1005 RF" 666.344,68.89 r90 top
R641 "0R" "RES 0402/1005 RF" 650.253,48.476 r90 top
R642 "0R" "RES 0402/1005 RF" 635.508,48.476 r90 top
R643 "0R" "RES 0402/1005 RF" 620.776,48.476 r90 top
R644 "9.1kR" "RES 0402/1005 RF" 370.04,50.47 r0 top
R645 "13kR" "RES 0402/1005 RF" 360.973,45.402 r0 top
R646 "100kR" "RES 0402/1005 RF" 361.391,50.47 r0 top
R647 "100kR" "RES 0402/1005 RF" 141.656,34.608 r0 top
R648 "2R" "RES 0402/1005 RF" 154.292,35.814 r0 top
R649 "10kR" "RES 0402/1005 RF" 162.547,30.607 r180 top
R650 "100MR" "RES 0402/1005 RF" 128.88,29.426 r0 top
R651 "10kR" "RES 0402/1005 RF" 125.993,18.085 r270 top
R652 "1MR" "RES 0402/1005 RF" 156.832,30.264 r90 top
R653 "20R" "RES 0402/1005 RF" 128.753,12.451 r270 top
R654 "100R" "RES 0402/1005 RF" 163.322,26.238 r180 top
R655 "10kR" "RES 0402/1005 RF" 156.756,26.429 r270 top
R656 "10kR" "RES 0402/1005 RF" 123.876,11.633 r270 top
R657 "100R" "RES 0402/1005 RF" 136.436,9.436 r270 top
R658 "10kR" "RES 0402/1005 RF" 130.238,8.776 r270 top
R659 "10kR" "RES 0402/1005 RF" 426.326,105.893 r0 top
R660 "10kR" "RES 0402/1005 RF" 421.996,105.893 r0 top
R661 "10kR" "RES 0402/1005 RF" 417.665,105.893 r0 top
R662 "10kR" "RES 0402/1005 RF" 413.334,105.893 r0 top
R663 "10kR" "RES 0402/1005 RF" 409.016,105.893 r0 top
R664 "10kR" "RES 0402/1005 RF" 404.685,105.893 r0 top
R665 "0mR" "RES 0402/1005 RF" 39.014,209.378 r270 top
R666 "12mR" "RES 1206/3216" 45.266,205.057 r90 top
R667 "24.9kR" "RES 0402/1005 RF" 42.528,202.265 r180 top
R668 "20kR" "RES 0402/1005 RF" 362.941,215.982 r90 top
R669 "0mR" "RES 0402/1005 RF" 38.887,200.381 r270 top
R670 "0mR" "RES 0402/1005 RF" 37.668,200.388 r270 top
R671 "1.87kR" "RES 0402/1005 RF" 218.007,323.545 r0 top
R672 "1.5kR" "RES 0402/1005 RF" 254.433,334.124 r0 top
R673 "1.87kR" "RES 0402/1005 RF" 241.467,334.124 r0 top
R674 "15kR" "RES 0402/1005 RF" 232.818,334.124 r0 top
R675 "0mR" "RES 0402/1005 RF" 366.883,133.883 r0 top
R676 "20kR" "RES 0402/1005 RF" 233.582,321.424 r0 top
R677 "95.3kR" "RES 0402/1005 RF" 44.716,192.483 r270 top
R678 "95.3kR" "RES 0402/1005 RF" 43.658,192.483 r270 top
R679 "95.3kR" "RES 0402/1005 RF" 45.775,195.483 r90 top
R680 "95.3kR" "RES 0402/1005 RF" 43.658,195.483 r90 top
R681 "24.9kR" "RES 0402/1005 RF" 51.568,194.019 r180 top
R682 "7.5kR" "RES 0402/1005 RF" 45.775,192.483 r90 top
R683 "4.87kR" "RES 0402/1005 RF" 42.6,192.483 r90 top
R684 "7.15kR" "RES 0402/1005 RF" 44.716,195.483 r270 top
R685 "5.9kR" "RES 0402/1005 RF" 42.6,195.483 r270 top
R686 "412kR" "RES 0402/1005 RF" 56.27,215.062 r90 top
R687 "57.6kR" "RES 0402/1005 RF" 61.953,210.719 r270 top
R688 "10kR" "RES 0402/1005 RF" 400.355,105.893 r0 top
R689 "20kR" "RES 0402/1005 RF" 160.795,347.612 r90 top
R690 "100kR" "RES 0402/1005 RF" 159.652,347.612 r90 top
R691 "20kR" "RES 0402/1005 RF" 158.102,351.698 r0 top
R692 "0R" "RES 0402/1005 RF" 360.883,130.988 r90 top
R693 "0mR" "RES 0402/1005 RF" 399.136,142.354 r90 top
R694 "1kR" "RES 0402/1005 RF" 231.723,323.635 r90 top
R695 "100R" "RES 0402/1005 RF" 165.024,277.812 r90 top
R696 "0mR" "RES 0402/1005 RF" 377.025,142.354 r90 top
R697 "0mR" "RES 0402/1005 RF" 441.414,62.446 r90 top
R697_1 "0mR" "RES 0402/1005 RF" 61.554,108.973 r180 top (schematic designator R697)
R698 "0mR" "RES 0402/1005 RF" 434.048,62.446 r90 top
R698_1 "0mR" "RES 0402/1005 RF" 64.305,108.973 r0 top (schematic designator R698)
R699 "0mR" "RES 0402/1005 RF" 426.682,62.446 r90 top
R699_1 "0mR" "RES 0402/1005 RF" 61.554,109.979 r180 top (schematic designator R699)
R700 "0mR" "RES 0402/1005 RF" 419.316,62.446 r90 top
R700_1 "0mR" "RES 0402/1005 RF" 64.305,109.979 r0 top (schematic designator R700)
R701 "0mR" "RES 0402/1005 RF" 412.458,62.446 r90 top
R701_1 "0mR" "RES 0402/1005 RF" 61.554,111.006 r180 top (schematic designator R701)
R702 "0mR" "RES 0402/1005 RF" 405.092,62.446 r90 top
R702_1 "0mR" "RES 0402/1005 RF" 64.305,111.006 r0 top (schematic designator R702)
R703 "0mR" "RES 0402/1005 RF" 397.713,62.446 r90 top
R703_1 "0mR" "RES 0402/1005 RF" 77.381,130.791 r180 top (schematic designator R703)
R704 "0mR" "RES 0402/1005 RF" 390.347,62.446 r90 top
R704_1 "0mR" "RES 0402/1005 RF" 80.094,130.791 r0 top (schematic designator R704)
R705 "0mR" "RES 0402/1005 RF" 382.981,62.446 r90 top
R705_1 "0mR" "RES 0402/1005 RF" 77.381,131.756 r180 top (schematic designator R705)
R706 "0mR" "RES 0402/1005 RF" 375.615,62.446 r90 top
R706_1 "0mR" "RES 0402/1005 RF" 80.094,131.756 r0 top (schematic designator R706)
R707 "0mR" "RES 0402/1005 RF" 368.249,62.446 r90 top
R707_1 "0mR" "RES 0402/1005 RF" 77.381,132.741 r180 top (schematic designator R707)
R708 "0mR" "RES 0402/1005 RF" 360.883,62.446 r90 top
R708_1 "0mR" "RES 0402/1005 RF" 80.094,132.741 r0 top (schematic designator R708)
R709 "2.2kR" "RES 0402/1005 RF" 110.217,285.162 r270 bottom
R710 "10kR" "RES 0402/1005 RF" 643.674,109.855 r90 top
R711 "0mR" "RES 0402/1005 RF" 629.958,109.855 r90 top
R712 "0mR" "RES 0402/1005 RF" 636.562,109.855 r90 top
R713 "0mR" "RES 0402/1005 RF" 622.846,109.855 r90 top
R714 "2.2kR" "RES 0402/1005 RF" 513.08,109.855 r90 top
R715 "10kR" "RES 0402/1005 RF" 360.807,108.489 r90 top
R716 "261R" "RES 0402/1005 RF" 389.585,93.218 r90 top
R717 "261R" "RES 0402/1005 RF" 382.473,93.218 r90 top
R718 "261R" "RES 0402/1005 RF" 375.361,93.218 r90 top
R719 "261R" "RES 0402/1005 RF" 368.249,93.218 r90 top
R720 "261R" "RES 0402/1005 RF" 360.883,93.218 r90 top
R721 "10k" "RES 0402/1005 RF" 310.401,29.858 r90 top
R722 "0R" "RES 0402/1005 RF" 280.924,29.858 r90 top
R723 "0R" "RES 0402/1005 RF" 252.26,29.858 r90 top
R724 "0R" "RES 0402/1005 RF" 237.528,29.858 r90 top
R725 "0R" "RES 0402/1005 RF" 667.969,61.589 r90 top
R726 "0R" "RES 0402/1005 RF" 642.874,48.476 r90 top
R727 "0R" "RES 0402/1005 RF" 628.142,48.476 r90 top
R728 "0R" "RES 0402/1005 RF" 613.41,48.476 r90 top
R729 "0R" "RES 0402/1005 RF" 606.044,48.476 r90 top
R730 "4.7kR" "RES 0402/1005 RF" 269.418,92.545 r90 top
R731 "4.7kR" "RES 0402/1005 RF" 276.784,92.545 r90 top
R732 "4.7kR" "RES 0402/1005 RF" 283.642,92.545 r90 top
R733 "4.7kR" "RES 0402/1005 RF" 291.008,92.545 r90 top
R734 "4.7kR" "RES 0402/1005 RF" 298.387,92.545 r90 top
R735 "10kR" "RES 0402/1005 RF" 382.981,193.865 r90 top
R736 "0mR" "RES 0402/1005 RF" 360.883,118.783 r90 top
R737 "10kR" "RES 0402/1005 RF" 370.802,65.601 r90 top
R738 "0mR" "RES 0402/1005 RF" 395.821,72.446 r90 top
R738_1 "0mR" "RES 0402/1005 RF" 78.943,108.682 r180 top (schematic designator R738)
R739 "0mR" "RES 0402/1005 RF" 390.747,72.281 r90 top
R739_1 "0mR" "RES 0402/1005 RF" 81.658,108.682 r0 top (schematic designator R739)
R740 "0mR" "RES 0402/1005 RF" 381.305,72.014 r90 top
R740_1 "0mR" "RES 0402/1005 RF" 78.942,109.79 r180 top (schematic designator R740)
R741 "0mR" "RES 0402/1005 RF" 375.615,72.314 r90 top
R741_1 "0mR" "RES 0402/1005 RF" 81.658,109.79 r0 top (schematic designator R741)
R742 "0mR" "RES 0402/1005 RF" 368.249,72.314 r90 top
R742_1 "0mR" "RES 0402/1005 RF" 78.942,110.815 r180 top (schematic designator R742)
R743 "0mR" "RES 0402/1005 RF" 360.883,72.314 r90 top
R743_1 "0mR" "RES 0402/1005 RF" 81.658,110.815 r0 top (schematic designator R743)
R744 "10kR" "RES 0402/1005 RF" 396.024,105.893 r0 top
R745 "20kR" "RES 0402/1005 RF" 206.874,311.64 r270 top
R746 "10kR" "RES 0402/1005 RF" 404.584,168.974 r90 top
R747 "10kR" "RES 0402/1005 RF" 411.95,168.974 r90 top
R748 "10kR" "RES 0402/1005 RF" 419.316,168.974 r90 top
R749 "10kR" "RES 0402/1005 RF" 426.682,168.974 r90 top
R750 "10kR" "RES 0402/1005 RF" 434.048,168.974 r90 top
R751 "10kR" "RES 0402/1005 RF" 441.414,168.974 r90 top
R752 "10kR" "RES 0402/1005 RF" 448.272,168.974 r90 top
R753 "10kR" "RES 0402/1005 RF" 455.651,168.974 r90 top
R754 "10kR" "RES 0402/1005 RF" 463.017,168.974 r90 top
R755 "10kR" "RES 0402/1005 RF" 470.383,168.974 r90 top
R756 "10kR" "RES 0402/1005 RF" 477.749,168.974 r90 top
R757 "10kR" "RES 0402/1005 RF" 485.115,168.974 r90 top
R758 "0mR" "RES 0402/1005 RF" 397.205,168.974 r90 top
R758_1 "0mR" "RES 0402/1005 RF" 62.638,76.815 r180 top (schematic designator R758)
R759 "0mR" "RES 0402/1005 RF" 389.839,168.974 r90 top
R759_1 "0mR" "RES 0402/1005 RF" 65.529,76.806 r0 top (schematic designator R759)
R760 "0mR" "RES 0402/1005 RF" 382.473,168.974 r90 top
R760_1 "0mR" "RES 0402/1005 RF" 62.64,77.822 r180 top (schematic designator R760)
R761 "0mR" "RES 0402/1005 RF" 375.615,168.974 r90 top
R761_1 "0mR" "RES 0402/1005 RF" 65.529,77.813 r0 top (schematic designator R761)
R762 "0mR" "RES 0402/1005 RF" 368.249,168.974 r90 top
R762_1 "0mR" "RES 0402/1005 RF" 62.64,78.813 r180 top (schematic designator R762)
R763 "0mR" "RES 0402/1005 RF" 360.883,168.974 r90 top
R763_1 "0mR" "RES 0402/1005 RF" 65.529,78.803 r0 top (schematic designator R763)
R764 "WSHP28184L000FEA" WSHP2818 391.008,83.947 r90 top
R765 "0mR" "RES 0402/1005 RF" 375.615,193.865 r90 top
R766 "0mR" "RES 0402/1005 RF" 368.249,193.865 r90 top
R767 "0mR" "RES 0402/1005 RF" 360.883,193.865 r90 top
R768 "0mR" "RES 0402/1005 RF" 776.059,202.59 r90 top
R769 "0mR" "RES 0402/1005 RF" 768.68,202.59 r90 top
R770 "0mR" "RES 0402/1005 RF" 761.314,202.59 r90 top
R771 "0mR" "RES 0402/1005 RF" 754.456,202.59 r90 top
R772 "0mR" "RES 0402/1005 RF" 95.331,345.084 r90 top
R773 "0mR" "RES 0402/1005 RF" 94.055,345.231 r90 top
R774 "0mR" "RES 0402/1005 RF" 172.834,355.491 r90 top
R775 "0mR" "RES 0402/1005 RF" 171.751,355.694 r90 top
R776 "0mR" "RES 0402/1005 RF" 152.468,308.038 r180 top
R777 "0mR" "RES 0402/1005 RF" 152.468,306.984 r180 top
R778 "0mR" "RES 0402/1005 RF" 152.475,305.638 r180 top
R779 "0mR" "RES 0402/1005 RF" 152.425,304.013 r180 top
R780 "0mR" "RES 0402/1005 RF" 688.149,202.59 r90 top
R781 "0mR" "RES 0402/1005 RF" 681.291,202.59 r90 top
R782 "0mR" "RES 0402/1005 RF" 673.925,202.59 r90 top
R783 "0mR" "RES 0402/1005 RF" 666.559,202.59 r90 top
R784 "0mR" "RES 0402/1005 RF" 651.827,202.59 r90 top
R785 "0mR" "RES 0402/1005 RF" 644.449,202.59 r90 top
R786 "0mR" "RES 0402/1005 RF" 637.083,202.59 r90 top
R787 "0mR" "RES 0402/1005 RF" 629.717,202.59 r90 top
R788 "0mR" "RES 0402/1005 RF" 622.351,202.59 r90 top
R789 "0mR" "RES 0402/1005 RF" 614.985,202.59 r90 top
R790 "0mR" "RES 0402/1005 RF" 104.927,440.855 r90 top
R791 "0mR" "RES 0402/1005 RF" 102.375,440.645 r90 top
R792 "0mR" "RES 0402/1005 RF" 100.063,440.721 r90 top
R793 "0mR" "RES 0402/1005 RF" 97.46,440.492 r90 top
R794 "0mR" "RES 0402/1005 RF" 95.136,440.746 r90 top
R795 "0mR" "RES 0402/1005 RF" 92.494,440.81 r90 top
R796 "0mR" "RES 0402/1005 RF" 556.552,202.59 r90 top
R797 "0mR" "RES 0402/1005 RF" 541.82,202.59 r90 top
R798 "0mR" "RES 0402/1005 RF" 527.088,202.59 r90 top
R799 "0mR" "RES 0402/1005 RF" 519.722,202.59 r90 top
R800 "0mR" "RES 0402/1005 RF" 63.119,343.835 r90 top
R801 "0mR" "RES 0402/1005 RF" 56.261,343.835 r90 top
R802 "0mR" "RES 0402/1005 RF" 48.895,343.835 r90 top
R803 "0mR" "RES 0402/1005 RF" 490.753,202.59 r90 top
R804 "0mR" "RES 0402/1005 RF" 483.387,202.59 r90 top
R805 "0mR" "RES 0402/1005 RF" 468.655,202.59 r90 top
R806 "0mR" "RES 0402/1005 RF" 461.289,202.59 r90 top
R807 "0mR" "RES 0402/1005 RF" 453.923,202.59 r90 top
R808 "0mR" "RES 0402/1005 RF" 431.825,202.59 r90 top
R809 "0mR" "RES 0402/1005 RF" 417.538,202.59 r90 top
R810 "0mR" "RES 0402/1005 RF" 410.413,202.59 r90 top
R811 "0mR" "RES 0402/1005 RF" 396.443,202.59 r90 top
R812 "0mR" "RES 0402/1005 RF" 389.331,202.59 r90 top
R813 "0mR" "RES 0402/1005 RF" 382.219,202.59 r90 top
R814 "0mR" "RES 0402/1005 RF" 375.107,202.59 r90 top
R815 "0mR" "RES 0402/1005 RF" 367.995,202.59 r90 top
R816 "0mR" "RES 0402/1005 RF" 360.883,202.59 r90 top
R817 "10kR" "RES 0402/1005 RF" 391.693,105.893 r0 top
R818 "10kR" "RES 0402/1005 RF" 387.363,105.893 r0 top
R819 "10kR" "RES 0402/1005 RF" 383.045,105.893 r0 top
R820 "10kR" "RES 0402/1005 RF" 378.714,105.893 r0 top
R821 "10kR" "RES 0402/1005 RF" 374.383,105.893 r0 top
R822 "10kR" "RES 0402/1005 RF" 370.053,105.893 r0 top
R823 "10kR" "RES 0402/1005 RF" 365.722,105.893 r0 top
R824 "10kR" "RES 0402/1005 RF" 361.391,105.893 r0 top
R832 "100kR" "RES 0402/1005 RF" 426.682,28.029 r90 top
R833 "10kR" "RES 0402/1005 RF" 419.316,28.029 r90 top
R834 "10kR" "RES 0402/1005 RF" 411.95,28.029 r90 top
R835 "100kR" "RES 0402/1005 RF" 34.397,201.93 r0 top
R836 "10kR" "RES 0402/1005 RF" 416.484,5.855 r90 top
R837 "10kR" "RES 0402/1005 RF" 388.76,23.99 r90 top
R838 "20kR" "RES 0402/1005 RF" 382.473,28.029 r90 top
R839 "10kR" "RES 0402/1005 RF" 375.107,28.029 r90 top
R840 "20kR" "RES 0402/1005 RF" 367.741,28.029 r90 top
R841 "20kR" "RES 0402/1005 RF" 360.883,28.029 r90 top
S1 "Mode Switch" SO8_N 230.073,348.386 r180 top
S2 "430181038816" 430181038816 402.45,61.481 r90 top
S3 "430181038816" 430181038816 393.903,62.357 r90 top
S4 "430181038816" 430181038816 441.554,41.999 r90 top
S5 "Mode Switch" SO8_N 382.27,20.13 r0 top
S6 "430181038816" 430181038816 432.473,94.424 r90 top
S7 "430181038816" 430181038816 569.138,135.871 r90 top